# Altium PCB MiniPC.PcbDoc (part 19 of 24)
Units mm, origin at the board's own origin, x right, y up, seen from the top; angles counter-clockwise.
Board outline 175 x 155 mm, 16 copper layers (1_Top, 2_int1_(gnd), 3_int2_(power), 4_int3_(gnd), 5_int4_(sign), 6_int5_(power), 7_int6_(sign), 8_int7_(power), 9_int8_(gnd), 10_int9_(sign), 11_int10_(gnd), 12_int11_(sign), 13_int12_(gnd), 14_int13_(power), 15_int14_(gnd), 16_Bottom), stack 2.008 mm thick; 1046 components, 837 nets, 6010 pads, 4009 vias.
Unrouted connection lines stored in the file: 564.
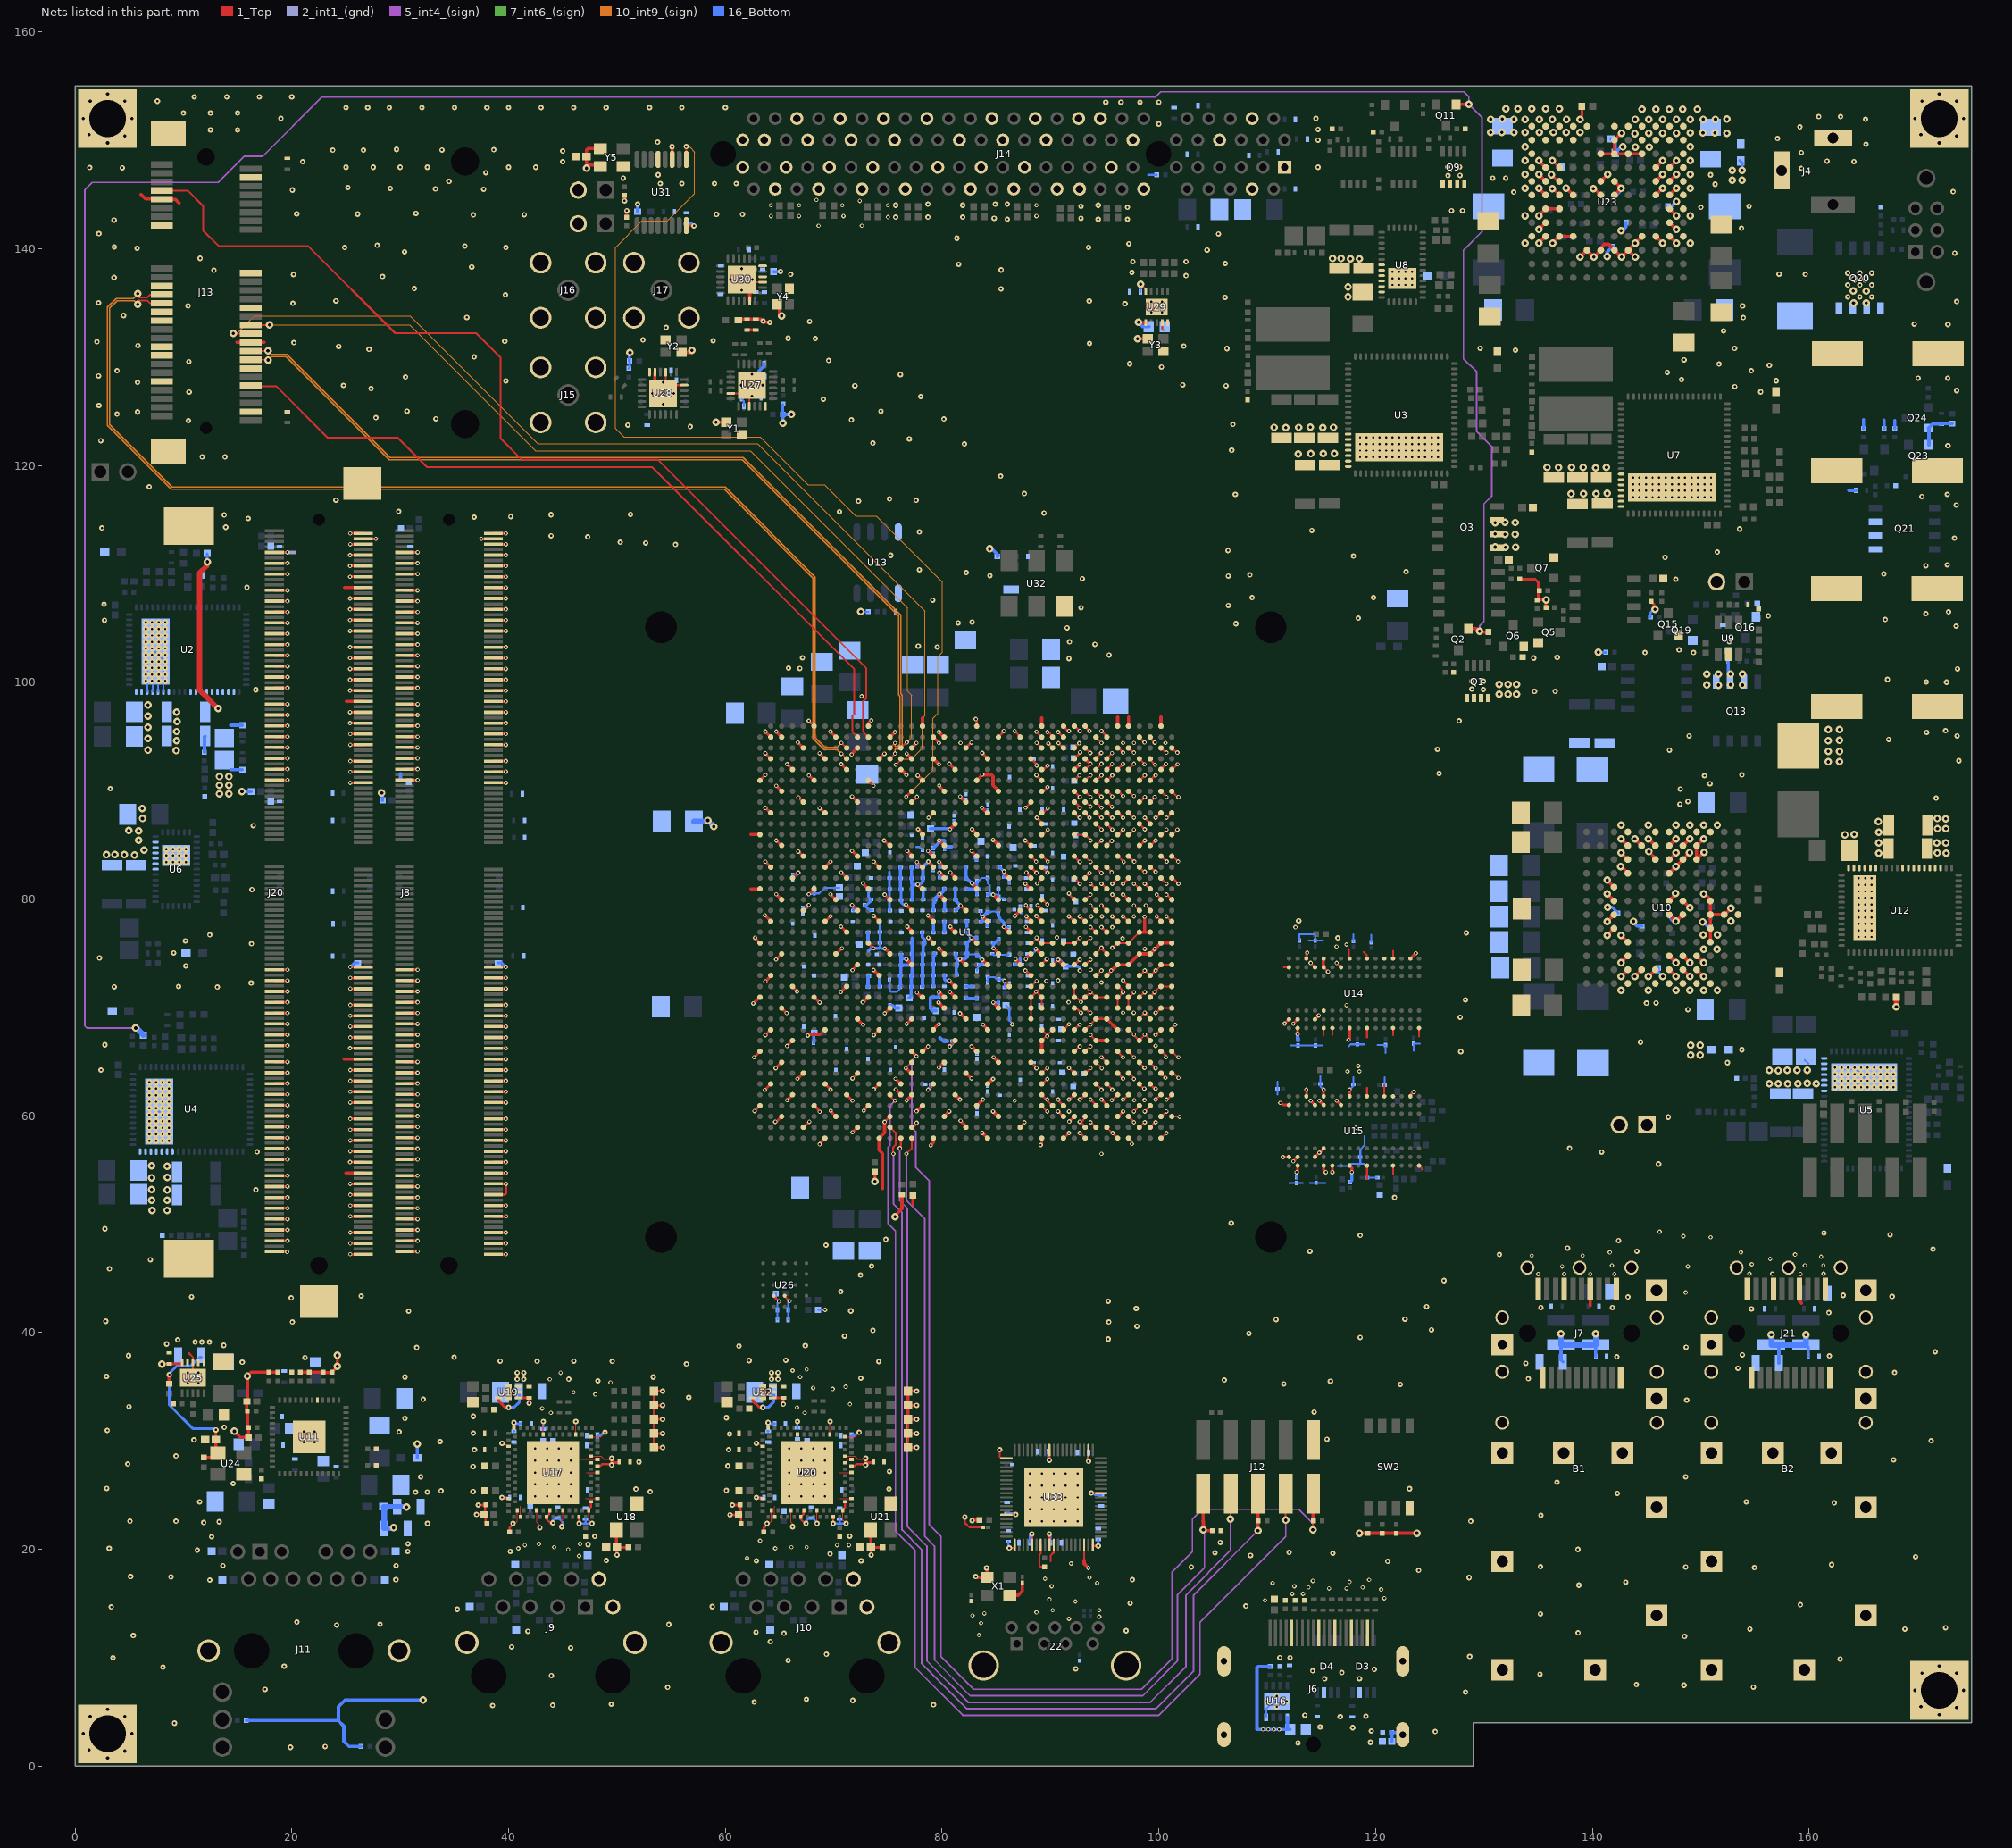
[diagram p31: the nets of this part, all layers, seen from the top]

## Via types
v1: diameter 0.4, hole 0.2, 1_Top to 16_Bottom, tented both sides, 1658 vias
v2: diameter 0.5, hole 0.2, 1_Top to 16_Bottom, tented both sides, 1014 vias
v3: diameter 0.7, hole 0.3, 1_Top to 16_Bottom, tented both sides, 915 vias
v4: diameter 0.6, hole 0.2, 1_Top to 16_Bottom, tented both sides, 278 vias
v5: diameter 0.4, hole 0.2, 1_Top to 16_Bottom, 93 vias
v6: diameter 0.4/0/0/0/0/0/0/0/0/0/0/0/0/0/0/0.4 (per signal layer), hole 0.2, 1_Top to 16_Bottom, tented both sides, 18 vias
v7: diameter 0.4/0/0/0/0/0/0/0/0/0/0/0.4/0.4/0.4/0.4/0.4 (per signal layer), hole 0.2, 1_Top to 16_Bottom, tented both sides, 16 vias
v8: diameter 0.5, hole 0.254, 1_Top to 16_Bottom, tented both sides, 15 vias
v9: diameter 0.5, hole 0.2, 1_Top to 16_Bottom, 2 vias

## Nets (pads, with @x,y where several pads share a name; then routed paths per layer and width w, separated by ;. In a path a pad name is that pad's centre, name@x,y a point inside that pad or via, vN(x,y) a via of type N, cw(c..) or ccw(c..) an arc to the next point about the centre after c; other vN are vias at no path point) (continued)
GND: (continued)
  16_Bottom w0.17: U2.32@6.65,99.11 U2.69@6.65,102.04 ; U2.31@7.15,99.11 7.15,102.54 U2.69@7.42,102.81 8.15,102.08 U2.29@8.15,99.11 ; U4.69@7.5,59.5 7.5,60.13 U4.69@7.77,60.4 8,60.17 U4.69@8,58.3 ; U2.30@7.65,99.11 U2.69@7.65,100.11 ; U6.39@8.875,84.455 U6.39@9.325,84.005 ; C514.2@61.5,126.15 61.7,125.95 C515.2@61.7,125.45 ; C197.1@75.15,72.565 75.16,72.555 75.16,71.54 75.275,71.425 75.825,71.425 76.11,71.71 C199.1@76.11,71.875 ; 77.6,84.8 77.885,84.8 C480.1@78.175,84.51 ; C249.1@82.31,74.975 82.31,74.91 83.055,74.91 C227.1@83.2,74.765 ; C158.1@83.2,73.36 83.2,73.539 83.454,73.793 C424.1@83.454,73.939 ; C184.1@83.2,81.64 83.34,81.64 83.64,81.94 C175.1@84.2,81.94 84.2,81.456 84.4,81.256 84.4,80.61 C436.1@84.2,80.41 ; C179.1@83.535,78.9 83.535,78.59 v1(83.75,78.375) ; 83.7,73.975 v1(83.7,74.4) ; C157.1@84.2,72.285 C260.1@84.2,72.765 84.22,72.785 84.859,72.785 85.054,72.59 C156.1@85.225,72.59 85.61,72.59 v1(85.75,72.45) v1@85.76,72.44 ; C183.1@84.2,78.765 84.471,78.765 84.566,78.86 84.884,78.86 85.079,78.665 C181.1@85.2,78.665 ; C230.1@84.635,74.95 84.771,74.814 85.121,74.814 C262.1@85.2,74.735 ; v1(84.704,80.404) 85.031,80.404 C174.1@85.2,80.235 ; v1@84.71,75.49 v1(84.75,75.45) 85.2,75 C262.1@85.2,74.735 ; C202.1@85.2,80.94 C174.1@85.2,80.235 ; v1(85.7,77.425) 85.735,77.39 C182.1@86.175,77.39 ; C201.1@85.74,79.975 85.74,80.065 85.37,80.065 C174.1@85.225,80.21 C174.1@85.2,80.235 ; C119.1@85.76,71.85 v1@85.76,72.44 ; 86.1,82 86.2,81.9 86.2,81.85 ; C216.1@86.19,74.9 86.025,74.735 85.959,74.735 85.859,74.835 85.3,74.835 C262.1@85.2,74.735 ; C259.1@86.2,72.215 85.985,72.215 v1@85.76,72.44 ; C180.1@87.2,79.315 87.2,78.7 87.4,78.7 ; 88.3,74.9 88.65,75.25 v1(88.65,75.4) ; 99,146.8 R332.2@99.8,146.8 ; U16.8@109.9,4.5 109.9,5.3 110.575,5.975 U16.9@110.875,5.975 ; 110.94,61.94 C269.1@110.94,62.5 110.94,63.16 ; 112.01,53.79 C265.1@112.725,53.79 113.29,53.79 ; 112.2,66.5 112.19,66.49 C264.1@112.85,66.49 C280.1@114.45,66.49 115.09,66.49 ; C270.1@112.95,76.16 112.95,76.75 114.35,76.75 114.425,76.675 C276.1@114.425,76.16 ; 113.84,76.16 C276.1@114.425,76.16 ; 113.9,53.8 115.4,53.8 ; 114.91,63.69 C275.1@114.91,62.95 114.91,62.69 v1(115.2,62.4) ; 115.14,76.16 C276.1@114.425,76.16 ; 116.468,55.368 117.383,55.368 117.59,55.575 118.585,55.575 ; 117.5,66.4 117.69,66.59 C268.1@118.3,66.59 118.99,66.59 ; v1(117.6,62.4) 117.94,62.74 C273.1@117.94,62.9 117.94,63.56 ; C278.1@117.95,76.11 117.95,76.75 ; 118.965,58.11 118.965,57.265 118.585,56.885 C281.1@118.585,56.175 118.585,55.575 ; C272.1@119.6,76.01 119.6,76.7 ; C282.1@120.14,54.3 C279.1@119.235,54.3 119.235,55.24 118.9,55.575 118.585,55.575 ; 120.16,66.54 C266.1@120.9,66.54 120.9,65.8 ; C277.1@120.835,62.825 120.835,63.565 ; 123.5,66 C274.1@123.5,66.665 124.065,66.665 ; C38.1@159.585,65.155 C38.1@159.934,64.806 ; U5.69@162.985,64.306 164.315,64.306 U5.69@165.085,63.536 U5.69@164.355,62.806
  16_Bottom w0.2: C388.1@65.8,41.2 65.8,42.775 v1(65.925,42.9) ; R322.1@68.55,42.1 v1(69.2,42.1)
  16_Bottom w0.25: v1(25.398,73.725) 25.773,74.1 R236.1@26.1,74.1 ; R231.1@39.025,74.1 39.375,74.1 v1(39.75,73.725) ; v1(71.694,79.439) 71.79,79.343 C127.1@71.79,78.925 ; C231.1@73.415,80.95 73.415,80.815 73.2,80.6 73.2,80.215 C244.1@73.465,79.95 73.465,79.865 73.04,79.44 C128.1@72.825,79.44 73.29,78.975 C234.1@73.54,78.975 ; 74.23,77.6 74.265,77.635 C167.1@74.265,76.95 C219.1@74.265,75.95 74.265,75.535 74.371,75.429 v1(74.704,75.429) ; 75.154,82.5 75.154,81.944 C221.1@75.135,81.925 75.135,80.95 C241.1@75.16,80.925 75.16,79.95 C245.1@75.135,79.925 75.135,78.975 C218.1@75.185,78.925 ; 76.21,80.735 C246.1@76.21,79.9 76.21,79.691 76.426,79.475 v1(76.675,79.475) ; C267.1@117.65,53.885 117.8,54.035 v1(117.8,54.8)
  16_Bottom w0.3: C288.1@30.025,90.9 30.025,91.55 ; 63.1,128.7 63.55,129.15 C512.2@63.55,129.4 ; C474.1@68.15,66.735 68.15,67.625 R237.1@68.2,67.675 ; C198.1@73.165,71.875 73.165,72.805 C125.1@73.235,72.875 ; C164.1@73.165,76.925 73.165,75.95 C240.1@73.19,75.925 ; 73.2,75.2 73.45,75.45 v1(73.675,75.45) 74.18,75.45 74.265,75.535 ; 74.229,72.829 74.229,71.961 C238.1@74.265,71.925 ; C124.1@75.175,70.19 75.41,70.19 75.65,69.95 R187.2@76,69.95 ; C199.1@76.11,71.875 76.154,71.919 76.154,72.881 C211.1@76.135,72.9 76.2,72.965 76.2,73.84 C428.1@76.21,73.85 ; C235.1@76.16,82.9 C243.1@76.16,81.9 76.16,80.785 76.21,80.735 ; C426.1@76.21,74.875 76.21,74.5 ; v1(76.7,74.45) 76.65,74.5 76.21,74.5 ; R188.2@76.95,70.875 77.135,71.06 C225.1@77.135,71.9 77.16,71.925 C212.1@77.16,72.925 77.225,72.99 77.225,74.225 ; C256.1@77.185,82.9 C207.1@77.185,81.9 77.185,81.415 77.235,81.365 ; 77.225,76.375 77.225,75.985 C208.1@77.26,75.95 77.235,75.925 C210.1@77.235,74.925 77.225,74.915 77.225,74.225 ; C440.1@77.235,79.95 77.235,81.365 ; C250.1@78.16,71.9 78.185,71.925 C226.1@78.185,72.925 C430.1@78.185,73.95 78.185,74.825 C239.1@78.26,74.9 78.26,75.671 78.36,75.771 C196.1@78.36,75.95 78.36,76.281 78.16,76.481 C236.1@78.16,76.925 ; C427.1@78.26,79.95 78.25,79.96 78.25,80.835 C232.1@78.34,80.925 78.15,80.925 v1(77.75,81.325) ; C459.1@79.175,77.89 79.185,77.88 C209.1@79.185,76.925 ; C204.1@79.175,82.685 79.175,83 v1(78.725,83.45) 78.235,82.96 C144.1@78.235,82.95 C242.1@78.235,81.925 78.235,81.635 77.925,81.325 v1(77.75,81.325) ; C143.1@79.175,84.685 79.725,85.235 v1(79.725,85.4) 80.2,85.4 80.225,85.375 C463.1@80.225,84.61 80.44,84.825 80.9,84.825 ; C251.1@79.185,71.95 79.21,71.975 C213.1@79.21,72.95 C429.1@79.21,73.975 79.21,74.696 79.335,74.821 C222.1@79.335,75 ; C191.1@79.21,78.95 79.21,79.59 79.335,79.715 C438.1@79.335,79.9 79.335,80.035 v1(79.75,80.45) ; 79.8,67.2 80.1,66.9 C451.1@80.44,66.9 ; C233.1@80.185,80.95 80.185,80.771 79.864,80.45 v1(79.75,80.45) ; C163.1@80.21,76.925 C458.1@80.21,77.925 ; C252.1@80.235,72.95 80.235,72.565 80.325,72.475 v1(80.675,72.475) ; C194.1@80.235,78.95 80.235,79.965 v1(79.75,80.45) ; C173.1@81.235,80.925 81.225,80.915 81.225,79.985 C171.1@81.235,79.975 81.235,79.865 v1(81.7,79.4) 81.7,79.39 C176.1@81.285,78.975 ; C214.1@81.285,74.95 81.285,74.515 81.5,74.3 81.385,74.185 C437.1@81.385,73.975 81.385,73.721 81.3,73.636 81.3,73.239 81.385,73.154 C255.1@81.385,72.975 ; v1(81.65,74.45) 82.114,74.45 82.31,74.646 C249.1@82.31,74.91 ; C253.1@82.2,71.915 82.21,71.925 C155.1@82.815,71.925 ; C190.1@82.21,82.9 C188.1@82.21,81.9 82.3,81.9 v1(82.75,81.45) 82.785,81.415 83.2,81.415 83.2,81.115 C187.1@83.39,80.925 83.2,80.735 C435.1@83.2,80.435 ; C200.1@82.225,70.84 82.25,70.815 C195.1@83.225,70.815 ; C249.1@82.31,74.975 82.275,75.01 82.275,75.586 82.31,75.621 82.31,75.9 C160.1@82.285,75.925 82.775,76.415 C166.1@83.175,76.415 83.165,76.425 v1(82.7,76.425) 82.285,76.84 C224.1@82.285,76.975 82.31,77 82.31,77.179 82.275,77.214 82.275,77.94 C203.1@82.31,77.975 ; C439.1@82.31,80.925 C187.1@83.2,80.925 ; 82.9,84.2 83.035,84.065 83.035,83.75 C193.1@83.175,83.61 ; C227.1@83.2,74.765 83.335,74.765 v1(83.7,74.4) ; C424.1@83.454,73.939 83.49,73.975 83.7,73.975 ; C177.1@83.585,77.925 C177.1@83.635,77.975 ; C162.1@84.175,77.51 84.175,77.81 C185.1@84.34,77.975 C177.1@83.635,77.975 ; C183.1@84.2,78.765 84.14,78.765 v1(83.75,78.375) 83.75,78.09 C177.1@83.635,77.975 ; C436.1@84.2,80.41 84.698,80.41 v1(84.704,80.404) ; v1@84.71,75.49 C254.1@84.71,75.95 84.86,75.95 C165.1@85.225,76.315 ; v1(84.725,70.45) 84.76,70.415 C120.1@85.2,70.415 ; C181.1@85.2,78.665 85.2,78.4 85.304,78.296 85.304,78.217 85.7,77.822 v1(85.7,77.425) ; C170.1@85.335,82.925 85.335,82.91 85.71,82.535 C172.1@85.71,82 86.1,82 ; C192.1@86.2,81.51 86.2,81.85 ; C263.1@86.71,73.975 C229.1@87.365,73.975 ; 87.2,74.5 87.2,74.14 C229.1@87.365,73.975 ; C229.1@87.39,73.95 C229.1@87.365,73.975 ; v1(90.7,74.4) 90.79,74.4 C417.1@91.4,73.79 92.51,73.79 92.7,73.6 v5(92.7,73.4) ; Q23.2@171.05,121.9 171.05,123.4 Q24.2@171,123.45 171.35,123.8 C79.1@172.2,123.8 172.25,123.85 R140.1@173.2,123.85 ; C428.1@76.21,73.85 76.21,74.5 ; C428.1@76.21,73.85 76.26,73.9 76.886,73.9 76.893,73.893 77.225,74.225 ; 77.235,81.365 77.275,81.325 v1(77.75,81.325)
  other v1: 91.7,13.6 94.5,13.8 94.5,14.4 92.3,15.2 148.6,43.7 135,45.4 137.4,45.4 139.8,45.4 142.025,45.4 159.2,45.4 154.475,45.425 156.6,45.425 161.325,45.425 137.2,46.1 148.8,46.1 141.8,46.2 159.6,46.2 161.3,46.2 154.7,46.3 156.4,46.8 161.1,47 134.4,47.1 139.1,47.1 158.7,47.2 141.6,47.4 153.7,47.4 150.9,48.8 148.4,48.9 146.2,49.3 114.8,56.6 97.72,61.44 98.67,61.45 99.7,66.46 93.7,68.4 97.68,69.5 96.7,69.52 89.61,72.44 95.6,73.4 73.679,73.454 94.7,75.5 96.65,76.37 88.725,76.425 90.6,76.45 83.7,91.475 93.7,92.475 90.7,95.4 72.579,98.705 68.6,142.1 72.6,142.1 75,142.9 64.2,143 66.8,143 70.9,143 88.7,143 64.2,144 66.8,144 70.8,144 75,144 88.7,144 72.4,144.4 68.4,144.5
  other v2: 19.875,1.75 23.075,1.825 112.825,2.15 119.525,2.2 125.5,3.2 119.6,3.25 117.88,3.56 114.875,3.625 9.175,3.975 116.73,4.56 119.11,4.61 113.46,4.7 110.875,5.475 38.525,5.6 44.075,5.625 79.2,5.675 49.475,5.725 62.675,5.925 109.975,5.975 111.775,5.975 71.75,6.075 67.475,6.175 110.875,6.475 128.3,6.825 17.525,7.1 54.675,7.275 154.85,7.3 148.45,7.475 144.05,7.525 115.3,8.06 118.5,8.08 43.95,8.375 135.15,8.5 116.88,8.64 114.18,8.81 119.87,8.92 92.325,8.975 8.1,9.125 19.3,9.225 65.8,9.775 162.85,9.9 3.5,10 111.15,10.025 112.1,10.025 128.675,10.125 69.325,10.325 45.725,10.925 40.275,11 64.15,11.5 148.5,11.975 5.375,12.05 65.41,12.27 138.675,12.3 62.84,12.36 41.775,12.45 96.975,12.5 154.525,12.65 168.825,12.65 172.575,12.775 24.125,13.025 54.775,13.075 28.15,13.1 20.475,13.3 135.2,14.05 35.275,14.475 3.35,14.7 58.8,14.725 108.025,14.775 159.2,14.9 97.35,15.05 138.75,16.7 143.075,16.975 12.425,17.175 29.6,17.2 97.55,17.2 128.625,17.4 8.85,17.45 5.125,17.5 123.975,18.075 154.95,18.325 103,18.375 148.6,18.375 135.2,18.4 13.64,18.5 29.625,18.5 162.05,18.6 121.1,18.9 62.85,18.95 72.525,18.95 49.025,18.975 169.825,19.325 108.45,19.45 69.65,19.6 116.05,19.65 105.17,19.69 112.025,19.725 30.7,19.825 40.15,19.825 11.275,19.925 138.65,20 3.15,20.1 47.325,20.45 30.725,20.525 105.66,20.64 12.59,21.17 47.95,21.2 71.475,21.225 32.525,22.4 11.88,22.48 13.3,22.55 5.075,22.6 9.325,22.6 88.1,22.6 89.2,22.6 90.3,22.6 91.4,22.6 92.5,22.6 128.775,22.6 135.25,23.15 88.1,23.7 89.2,23.7 90.3,23.7 91.4,23.7 92.5,23.7 162.3,24.3 11.5,24.4 154.2,24.4 88.1,24.8 89.2,24.8 90.3,24.8 91.4,24.8 92.5,24.8 42.45,24.9 43.55,24.9 44.65,24.9 45.75,24.9 65.9,24.9 67,24.9 68.1,24.9 69.2,24.9 142.3,25.175 31.425,25.275 32.5,25.3 53.075,25.325 36.725,25.35 33.775,25.4 60.1,25.45 51.75,25.575 75.1,25.575 123.125,25.6 2.925,25.625 88.1,25.9 89.2,25.9 90.3,25.9 91.4,25.9 92.5,25.9 42.45,26 43.55,26 44.65,26 45.75,26 65.9,26 67,26 68.1,26 69.2,26 14.587,26.075 136.725,26.2 31.9,26.7 148.6,26.7 88.1,27 89.2,27 90.3,27 91.4,27 92.5,27 42.45,27.1 43.55,27.1 44.65,27.1 45.75,27.1 65.9,27.1 67,27.1 68.1,27.1 69.2,27.1 75.125,27.2 36.725,27.65 60.225,27.7 4.875,27.875 52.025,28.075 42.45,28.2 43.55,28.2 44.65,28.2 45.75,28.2 65.9,28.2 67,28.2 68.1,28.2 69.2,28.2 167.775,28.275 9.325,28.625 36.85,29.2 60.3,29.2 42.45,29.3 43.55,29.3 44.65,29.3 45.75,29.3 65.9,29.3 67,29.3 68.1,29.3 69.2,29.3 21.112,29.875 22.112,29.875 33.675,29.95 171.25,30.025 10.975,30.1 115.51,30.165 60.375,30.65 36.75,30.725 29.9,30.85 21.112,30.875 22.112,30.875 2.975,30.975 13.775,31.25 30.425,32.075 60.1,32.15 36.75,32.275 114.325,32.675 4.975,33.175 148.7,33.775 32.125,33.85 56.625,34.025 122.275,35.225 111.525,35.275 10.387,35.325 11.387,35.325 115.825,35.525 48.225,35.55 106.025,35.625 45.55,35.7 134.08,35.75 72.5,35.8 30.425,35.9 53.35,35.9 2.9,35.975 10.387,36.325 11.387,36.325 167.875,36.325 153.43,36.71 56.4,37.1 133.85,37.17 15.425,37.275 74.15,37.325 42.625,37.35 49.575,37.35 39.225,37.375 46.025,37.375 62.2,37.425 65.575,37.45 21.225,37.7 34.975,37.725 142.25,37.77 161.86,37.84 4.925,37.875 153.83,37.95 171.625,38.225 31.525,38.625 148.65,38.65 61.25,38.75 67.375,38.8 13.725,38.825 8.45,38.95 9.475,39.325 95.325,39.4 118.575,39.55 71,39.675 108.3,39.925 73.625,40.2 125.15,40.25 97.975,40.575 20.05,40.975 95.375,40.975 2.825,41.05 110.8,41.2 122.7,41.25 161.81,41.84 30.775,41.975 71.575,42 154.67,42.19 97.9,42.225 135.25,42.31 141.84,42.31 124.7,42.4 95.325,42.9 19.95,43.2 10.75,43.3 143.27,43.29 167.65,43.325 26.4,43.375 163.14,43.44 70.65,43.775 126.3,44.8 72.475,45.3 3.175,45.875 73.5,46.125 6.95,46.725 131.4,47.2 113.925,47.5 144.1,47.5 171.425,47.7 137.7,47.8 69.275,48.075 142.4,48.5 74.8,48.6 118.575,48.975 167.45,49.025 161.35,49.2 2.775,49.575 106.675,50.1 121.75,52.475 16.7,53.175 146.1,55.55 140.85,56.65 16.8,56.675 137.9,57 147,59.875 2.4,64.225 152.45,64.9 127.85,65.925 153.775,66.1 2.75,66.55 144.44,66.795 127.8,69.1 148.815,69.795 144.99,70.395 145.865,70.42 128.275,70.7 13.125,71.875 3.625,71.9 9.55,71.925 16.25,72.25 10.225,73.825 2.25,74.55 9.1,75.025 16.275,75.875 10.19,76.14 116.5,76.4 12.425,76.7 128.35,76.875 112.9,78 16.325,80.875 16.45,86.775 148.065,88.745 148.815,88.995 171.705,89.31 148.115,90.145 3.25,90.175 150.84,90.645 150.34,91.37 153.79,91.445 125.85,91.575 173.8,92.75 147.095,93.725 125.7,93.8 167.325,94.725 148.92,95.05 173.65,95.05 170.825,95.375 172.575,95.525 127.7,96.425 134.65,99.15 136.55,99.15 16.675,99.3 172.675,100 170.8,100.025 167.225,100.25 173.675,101.225 66.875,101.275 65.825,101.3 91.7,102.175 134.575,102.225 67.125,102.25 136.75,102.275 95.4,102.5 144.845,102.725 149.32,102.725 147.995,102.975 79.55,103.25 77.8,103.325 94.1,103.5 91.75,103.725 152.62,103.75 91.525,105.025 173.55,105.175 107.1,105.4 81.475,105.475 82.775,105.55 2.725,105.725 167.025,105.775 118.4,105.9 156.22,106.107 170.775,106.325 172.85,106.475 92.825,106.875 106.4,107.075 2.675,107.175 79.125,107.575 108.6,107.8 119.8,107.8 15.875,108.75 147.695,109.5 92.925,109.55 84.4,109.825 106.4,109.8 108.4,109.9 166.875,109.975 82.225,110.1 122.8,110.2 77.9,110.375 170.775,110.75 172.75,110.825 146.69,111.5 117.95,111.625 75.25,111.7 151.51,112 106.375,112.15 55.4,112.7 52.65,112.85 50.3,112.9 173.4,113.275 47.3,113.4 43.925,113.5 77.9,113.85 114.1,114 153.57,114.135 2.475,114.225 13.9,114.3 15.975,115.1 36.825,115.225 40.2,115.275 13.775,115.425 43.925,115.45 51.25,115.475 89.4,115.6 70.525,115.725 29.85,115.75 173.575,116.35 72.275,116.7 77.6,116.775 24.075,116.8 75.15,116.9 170.4,117.125 107.05,117.325 172.75,117.325 87.6,117.4 6.85,118.025 85.4,119 11.725,120.775 13.825,120.775 106.72,121.39 172.8,121.8 82.05,121.975 73.6,122.05 2.375,122.275 76.975,122.45 56.75,123.575 51,123.725 106.83,123.78 10.45,124.125 71.625,124.2 80.15,124.275 33.3,124.3 27.75,124.4 3.875,124.725 5.775,124.925 30.625,125 74.35,125 2.2,125.525 69.05,126.1 78.025,126.35 10.525,126.775 155.53,126.78 173.6,126.905 27.3,127.075 153.14,127.26 71.95,127.35 106.2,127.35 24.775,127.375 102.2,127.425 5.775,127.65 39.75,127.8 156.96,127.81 148.22,127.91 170.05,128.05 172.775,128.05 30.5,128.15 2.175,128.25 76.15,128.375 146.89,128.59 154.66,128.72 3.875,128.725 100.24,129.07 156.32,129.22 151.68,129.35 97.3,129.375 10.5,129.575 69.525,129.675 148.45,129.74 36.825,130 132.89,130.635 27.125,130.7 106.275,130.775 153.12,130.78 129.64,130.81 24.325,130.975 102.3,131 5.8,131.05 93.6,131.25 20.2,131.325 2.025,131.4 39.65,131.45 58.875,131.5 52.4,131.575 68.3,131.7 65.8,131.725 152.11,132.41 54.525,132.725 172.8,133 169.7,133.025 67.775,133.275 36.15,133.65 153.925,133.625 4.475,133.825 99.3,134.115 100.3,134.115 10.425,134.7 153.85,134.7 96.875,134.9 20.1,134.95 2.175,135 99.3,135.115 100.3,135.115 173.6,135.115 93.575,135.15 24.075,135.175 106.1,135.5 39.7,135.725 85.425,136.275 31.3,136.3 3.6,137.325 28.375,137.425 102.5,137.5 20.15,137.6 66.025,137.625 159.65,137.625 157.225,137.65 97.5,137.8 12.825,138 85.45,138.025 36.6,138.3 81.525,138.55 106.125,138.625 97.6,138.8 102.5,138.8 11.55,139.1 173.425,139.575 30.4,139.7 104.45,139.875 5.725,140.025 24.875,140.1 39.75,140.1 93.5,140.125 3.625,140.15 35.975,140.225 27.875,140.3 97.225,140.45 81.35,140.95 105.5,141.35 2.2,141.375 153.75,141.875 3.6,142.625 86,142.7 94.4,142.7 97.1,142.7 84.8,142.8 92.8,142.8 75.7,142.9 78.7,142.9 81.9,142.9 36.75,143.1 41.45,143.125 26.075,143.175 59.175,143.15 61.575,143.15 20.45,143.2 31.45,143.25 127,143.5 128,143.5 97.1,143.8 150,143.8 92.8,143.9 154.45,143.9 75.7,144 81.9,144 94.4,144 78.7,144.1 84.9,144.1 86,144.1 132.75,145.2 173.275,145.25 20.05,145.4 37.7,145.475 33.25,145.5 29.1,145.55 25.175,145.625 151.325,145.94 54,146 56,146 59,146 61,146 34.5,146.2 50.575,146.5 130.8,146.5 132,146.5 53.8,146.8 150.9,146.8 37.9,147 159.275,147.4 4.35,147.45 1.35,147.475 25,147.5 27.5,147.5 30,147.5 32.5,147.5 40,147.5 42.5,147.5 114.683,147.5 21,148 45,148 164.125,148.025 161.65,148.075 159.275,148.85 45,149 23.775,149.075 26.6,149.075 33.85,149.1 38.625,149.125 29.675,149.15 165.225,149.625 53.75,149.825 114.683,150 157.075,150.15 12.5,150.95 15,150.95 114.683,151 159.125,151.225 100,151.5 165.2,151.925 19,152 114.5,152 160.875,152.175 162.9,152.175 10,152.5 12.5,152.5 15,152.5 25,153 27,153 29,153 32,153 35,153 38,153 40,153 43,153 46,153 49,153 53,153 56,153 60,153 95.1,153.5 96.5,153.5 98.25,153.5 100,153.5 7.6,153.6 11,154 14,154 17,154 20,154
  other v3: 3,0.75 4.6,1.4 1.3,1.5 0.75,3 5.25,3 1.4,4.6 4.6,4.6 172,4.75 3,5.25 173.6,5.4 170.3,5.5 169.75,7 174.25,7 170.4,8.6 173.6,8.6 172,9.25 7.09,51.27 8.49,51.26 7.08,52.2 8.49,52.21 8.51,53.18 7.07,53.19 7.07,54.29 8.52,54.32 8.49,55.35 7.07,55.39 156.31,62.96 157.15,62.96 158,62.95 158.95,62.98 160.65,62.97 159.83,62.99 157.13,64.18 156.31,64.19 157.98,64.19 158.87,64.19 159.82,64.22 142.63,71.575 145.17,71.575 147.71,71.575 148.98,71.575 150.25,71.575 151.52,71.575 150.265,75.37 151.49,75.37 150.215,76.695 151.54,76.695 152.79,77.95 5.48,84.06 2.9,84.08 3.67,84.09 4.55,84.08 166.42,84.23 6.36,84.51 166.4,85.18 5.88,85.41 163.3,85.93 164.14,85.94 166.4,86.17 5.88,86.28 4.96,86.31 142.63,86.815 145.17,86.815 147.71,86.815 148.98,86.815 150.25,86.815 151.52,86.815 166.39,87.15 6.22,87.42 6.2,88.34 9.33,93.68 6.72,93.72 9.36,94.6 6.73,94.81 9.38,95.45 6.73,95.84 9.42,96.38 6.73,96.86 9.38,97.25 6.73,97.91 138.04,117.37 139.19,117.38 140.33,117.4 141.37,117.41 136.88,119.8 140.29,119.79 135.82,119.81 138.08,119.81 139.16,119.83 141.3,119.81 112.86,121.065 114.01,121.075 115.15,121.095 116.19,121.105 115.11,123.485 110.64,123.505 111.7,123.495 112.9,123.505 116.12,123.505 113.98,123.525 117.45,135.54 117.45,136.45 118.51,139.05 116.01,139.08 116.82,139.08 117.67,139.07 133.78,140.49 149.02,140.49 133.78,143.03 149.02,143.03 133.78,145.57 149.02,145.57 133.78,146.84 149.02,146.84 133.78,148.11 149.02,148.11 145.25,149.35 133.78,149.38 143.95,149.375 149.02,149.38 3,149.75 172,149.75 4.6,150.4 173.6,150.4 1.3,150.5 170.3,150.5 0.75,152 5.25,152 169.75,152 174.25,152 1.4,153.6 4.6,153.6 170.4,153.6 173.6,153.6 3,154.25 172,154.25
  other v4: 6.87,57.7 7.47,57.7 8.07,57.7 8.67,57.7 6.87,58.3 7.47,58.3 8.07,58.3 8.67,58.3 6.87,58.9 7.47,58.9 8.07,58.9 8.67,58.9 6.87,59.5 7.47,59.5 8.07,59.5 8.67,59.5 6.87,60.1 7.47,60.1 8.07,60.1 8.67,60.1 6.87,60.7 7.47,60.7 8.07,60.7 8.67,60.7 6.87,61.3 7.47,61.3 8.07,61.3 8.67,61.3 6.87,61.9 7.47,61.9 8.07,61.9 8.67,61.9 6.87,62.5 7.47,62.5 8.07,62.5 8.67,62.5 162.385,62.636 162.985,62.636 163.585,62.636 164.185,62.636 164.785,62.636 165.385,62.636 165.985,62.636 166.585,62.636 167.185,62.636 167.785,62.636 6.87,63.1 7.47,63.1 8.07,63.1 8.67,63.1 162.385,63.236 162.985,63.236 163.585,63.236 164.185,63.236 164.785,63.236 165.385,63.236 165.985,63.236 166.585,63.236 167.185,63.236 167.785,63.236 162.385,63.836 162.985,63.836 163.585,63.836 164.185,63.836 164.785,63.836 165.385,63.836 165.985,63.836 166.585,63.836 167.185,63.836 167.785,63.836 162.385,64.436 162.985,64.436 163.585,64.436 164.185,64.436 164.785,64.436 165.385,64.436 165.985,64.436 166.585,64.436 167.185,64.436 167.785,64.436 164.554,76.5 165.154,76.5 165.754,76.5 164.554,77.1 165.154,77.1 165.754,77.1 164.554,77.7 165.154,77.7 165.754,77.7 164.554,78.3 165.154,78.3 165.754,78.3 164.554,78.9 165.154,78.9 165.754,78.9 164.554,79.5 165.154,79.5 165.754,79.5 164.554,80.1 165.154,80.1 165.754,80.1 164.554,80.7 165.154,80.7 165.754,80.7 164.554,81.3 165.154,81.3 165.754,81.3 164.554,81.9 165.154,81.9 165.754,81.9 8.425,83.405 9.025,83.405 9.625,83.405 10.225,83.405 8.425,84.005 9.025,84.005 9.625,84.005 10.225,84.005 8.425,84.605 9.025,84.605 9.625,84.605 10.225,84.605 6.52,100.11 7.12,100.11 7.72,100.11 8.32,100.11 6.52,100.71 7.12,100.71 7.72,100.71 8.32,100.71 6.52,101.31 7.12,101.31 7.72,101.31 8.32,101.31 6.52,101.91 7.12,101.91 7.72,101.91 8.32,101.91 6.52,102.51 7.12,102.51 7.72,102.51 8.32,102.51 6.52,103.11 7.12,103.11 7.72,103.11 8.32,103.11 6.52,103.71 7.12,103.71 7.72,103.71 8.32,103.71 6.52,104.31 7.12,104.31 7.72,104.31 8.32,104.31 6.52,104.91 7.12,104.91 7.72,104.91 8.32,104.91 6.52,105.51 7.12,105.51 7.72,105.51 8.32,105.51 143.745,117.07 144.345,117.07 144.945,117.07 145.545,117.07 146.145,117.07 146.745,117.07 147.345,117.07 147.945,117.07 148.545,117.07 149.145,117.07 149.745,117.07 150.345,117.07 150.945,117.07 143.745,117.67 144.345,117.67 144.945,117.67 145.545,117.67 146.145,117.67 146.745,117.67 147.345,117.67 147.945,117.67 148.545,117.67 149.145,117.67 149.745,117.67 150.345,117.67 150.945,117.67 143.745,118.27 144.345,118.27 144.945,118.27 145.545,118.27 146.145,118.27 146.745,118.27 147.345,118.27 147.945,118.27 148.545,118.27 149.145,118.27 149.745,118.27 150.345,118.27 150.945,118.27 143.745,118.87 144.345,118.87 144.945,118.87 145.545,118.87 146.145,118.87 146.745,118.87 147.345,118.87 147.945,118.87 148.545,118.87 149.145,118.87 149.745,118.87 150.345,118.87 150.945,118.87 118.565,120.765 119.165,120.765 119.765,120.765 120.365,120.765 120.965,120.765 121.565,120.765 122.165,120.765 122.765,120.765 123.365,120.765 123.965,120.765 124.565,120.765 125.165,120.765 125.765,120.765 118.565,121.365 119.165,121.365 119.765,121.365 120.365,121.365 120.965,121.365 121.565,121.365 122.165,121.365 122.765,121.365 123.365,121.365 123.965,121.365 124.565,121.365 125.165,121.365 125.765,121.365 118.565,121.965 119.165,121.965 119.765,121.965 120.365,121.965 120.965,121.965 121.565,121.965 122.165,121.965 122.765,121.965 123.365,121.965 123.965,121.965 124.565,121.965 125.165,121.965 125.765,121.965 118.565,122.565 119.165,122.565 119.765,122.565 120.365,122.565 120.965,122.565 121.565,122.565 122.165,122.565 122.765,122.565 123.365,122.565 123.965,122.565 124.565,122.565 125.165,122.565 125.765,122.565 121.55,136.645 122.15,136.645 122.75,136.645 123.35,136.645 121.55,137.245 122.15,137.245 122.75,137.245 123.35,137.245 121.55,137.845 122.15,137.845 122.75,137.845 123.35,137.845
  other v5: 83.4,12.1 83.6,13.2 82.8,13.9 83.9,14.1 88.7,14.2 90.2,14.4 109.8,15.3 89.9,15.4 120.8,15.5 112.3,15.9 113.3,15.9 120.5,16.3 115.7,16.4 117.3,16.4 113.8,16.5 118.8,16.5 90.1,16.6 112.5,16.6 94.3,16.9 110.5,16.9 117.6,17 114.2,17.1 119.4,17.2 89.5,17.3 93.6,17.4 91.9,18.7 62,19.2 46.5,19.4 45.5,20 40.9,20.1 64.6,20.1 44.2,20.2 66.1,20.2 67.5,20.2 41.5,20.4 70.3,20.4 71.4,20.4 42.8,20.5 46.6,20.5 63.2,20.8 43.9,32.6 67.3,32.6 43.1,33 66.6,33.1 71.5,33.4 48,34.3 46,34.5 69.9,34.8 68.1,34.9 71.1,35 49.4,35.4 43.8,35.7 66.9,35.9 44.8,36.3 66.2,36.5 67.5,36.6 94.7,56.5 118.2,58.9 91.7,60.4 86.7,61.4 117.4,64.1 118.5,64.1 118.4,64.6 117.3,70.2 91.675,70.475 94.7,72.3 90.7,72.5 93.71,73.47 98.7,75.4 99.6,75.4 116.383,75.616 117.3,75.8 95.7,77.4 112.6,77.4 93.75,78.4 94.75,78.4 97.7,78.4 81.7,94.4 96.7,94.4 97.7,94.4 100.6,94.4
  other v8: 54.25,125.65 62.45,126.4 53.25,126.65 55.25,126.65 61.45,127.4 63.45,127.4 54.25,127.65 62.45,128.4 61.495,136.15 60.495,137.15 62.495,137.15 61.495,138.15
GND_DP: C308.2 J6.21 J6.22 J6.23 J6.24 R248.2 | length 1.8
  16_Bottom w0.3: R248.2@121.45,3.1 R248.2@121.49,3.1 ; R248.2@121.45,3.2 121.49,3.16 R248.2@121.49,3.1 ; C308.2@121.49,2.3 R248.2@121.49,3.1 ; J6.23@122.25,3 122.15,3.1 R248.2@121.49,3.1
GND_SIGNAL1: L8.2 R150.1 R151.2 R152.1 R153.2 R154.2 U10.F7 U10.F8 U10.G7 U10.G8 | length 8.7
  1_Top w0.3: U10.G7@147.075,78.56 v3(147.69,77.945) 147.73,77.945 U10.G8@148.345,78.56 ; U10.F7@147.075,79.83 147.66,80.415 v3(147.66,80.507) ; U10.F8@148.345,79.83 v3(148.98,79.195)
  16_Bottom w0.25: v3(150.165,77.895) 150.19,77.895 150.59,77.495 R152.1@150.89,77.495
  16_Bottom w0.3: v3(141.39,79.245) 141.815,79.245 R150.1@142.365,78.695 ; v3(143.796,77.939) 143.796,77.851 143.79,77.845 144.14,77.495 R153.2@144.565,77.495 ; R151.2@146.06,73.635 146.06,73.275 v3(146.49,72.845) ; R154.2@147.04,78.595 147.04,78.395 147.49,77.945 v3(147.69,77.945)
  other v3: 149.05,65.6 149.95,65.6 149.05,66.5 149.95,66.5
GND_SIGNAL2: C106.1 L9.2 R167.1 R168.2 R169.1 R170.2 R171.2 U23.F7 U23.F8 U23.G7 U23.G8 | length 11
  1_Top w0.3: v3(140.088,145.52) 140.18,145.52 U23.F7@140.765,144.935 ; U23.F8@140.765,146.205 v3(141.4,146.84) ; U23.G7@142.035,144.935 v3(142.65,145.55) 142.65,145.59 U23.G8@142.035,146.205
  16_Bottom w0.3: v3@141.35,139.25 141.35,139.675 R167.1@141.9,140.225 ; R169.1@141.7,150.125 142.1,149.725 C106.1@142.1,148.825 v3@142.625,149.35 ; R171.2@142,144.9 142.2,144.9 142.65,145.35 v3(142.65,145.55) ; v3(142.656,141.656) 142.744,141.656 142.75,141.65 143.1,142 R170.2@143.1,142.425 ; R168.2@146.96,143.92 147.32,143.92 v3(147.75,144.35) ; L9.2@153.6,148.125 153.8,147.925 v3(153.8,147.2)
  other v3: 141.35,139.25 152.9,146.3 153.8,146.3 152.9,147.2 142.787,149.38
HPS_0V95: C142.2 C143.2 C144.2 C145.2 C146.2 R25.2 R27.1 U1.N17 U1.P16 U1.P18 U1.R18 | length 8
  1_Top w0.3: v1(77.675,83.4) 78.136,82.939 U1.P16@78.194,82.939 ; v1(78.704,84.429) 78.721,84.429 79.194,83.956 U1.N17@79.194,83.939 ; v1(79.725,83.4) 79.733,83.4 U1.P18@80.194,82.939 ; v1(79.75,82.425) 79.825,82.425 80.194,82.056 U1.R18@80.194,81.939
  16_Bottom w0.3: 14.36,91.92 R25.2@15.44,91.92 ; v1(77.675,83.4) 77.675,82.99 C144.2@77.715,82.95 ; v1(78.704,84.429) 78.968,84.165 C143.2@79.175,84.165 ; v1(79.725,83.4) 79.84,83.285 C145.2@79.84,82.95 ; v1(79.75,82.425) 79.79,82.385 C146.2@79.79,81.975
  16_Bottom w0.5: C142.2@57.1,87.15 58.275,87.15 v3(58.375,87.25) 58.925,86.7 v3(58.925,86.675)
  other v3: 13.31,89.69 14.21,89.69 13.31,90.49 14.21,90.49 13.31,91.29 14.21,91.29
HPS_0V95OUT: C11.2 C12.2 R23.2 R26.1 R27.2 R28.1 R29.2 U2.16 U2.17 U2.18 U2.19 U2.20 U2.21 U2.22 U2.23 U2.24 | length 19.3
  1_Top w0.5: v3@12.15,111.05 12.15,110.736 11.5,110.086 11.5,99.26 13.18,97.58 v3(13.19,97.58)
  16_Bottom w0.25: R29.2@11.6,109.86 11.6,110.26 12.2,110.86 v3(12.2,111.1) R26.1@12.2,111.86
  16_Bottom w0.3: R28.1@11.94,93.54 11.94,94.975 C11.2@11.995,95.03 ; 14.36,96.03 R23.2@15.44,96.03
HPS_CLK1: U1.G15 U31.1 | length 90.1
  1_Top w0.17: v2(56.388,149.403) 56.395,149.395 U31.1@56.395,148.226
  1_Top w0.25: v5(76.683,89.428) U1.G15@77.194,89.939
  10_int9_(sign) w0.1: v2(56.388,149.403) 56.693,149.403 57.175,148.92 57.175,145.085 54.635,142.545 52.299,142.545 49.86,140.106 49.86,123.393 50.643,122.61 63.228,122.61 67.626,118.212 69.164,118.212 72.034,115.341 73.939,115.341 80.035,109.245 80.035,102.768 79.604,102.337 79.604,97.13 79.146,96.672 79.146,91.892 v5(76.683,89.428)
IO_1V8: C388.2 C389.2 C445.2 C446.2 C447.2 C448.2 C449.2 C450.2 C451.2 C452.2 C453.2 C454.2 C455.2 C456.2 C457.2 C539.2 C540.2 C546.2 C570.2 C571.2 C572.2 C573.2 C574.2 L14.1 L17.2 L18.2 L20.2 Q3.1 Q3.2 Q3.3 R195.1 R196.1 R203.1 R207.1 R300.2 R301.2 R302.2 R303.1 R305.2 R306.1 R308.1 R310.1 R312.1 R313.1 R317.1 R318.1 R319.1 R321.1 R324.1 R325.1 R326.1 R333.1 R334.1 R343.1 U1.AF18 U1.AF19 U1.AK19 U1.AL21 U1.AM18 U1.AP17 U1.AP22 U1.AT21 U1.H20 U1.J22 U1.K19 U1.R4 U1.T6 U1.V5 U26.B4 U31.16 U33.14 U33.38 U33.49 U33.59 U33.68 | length 74.7
  1_Top w0.2: U31.16@56.395,142.126 57.174,142.126 57.2,142.1 v2(57.1,142.1) ; U26.B4@64.475,43.4 64.475,43.35 v1(64.95,42.875) ; v1(78.7,62.4) 78.7,62.445 U1.AP17@79.194,62.939 ; v1(80.7,66.4) 80.7,66.445 U1.AK19@81.194,66.939 ; v1@83.68,61.425 v1(83.755,61.5) ; v1@84.655,63.4 v1(84.7,63.4) ; U33.14@85.925,23.2 86.875,23.2 86.85,23.225 v2(86.8,23.225) ; v2(89.9,28.225) U33.68@89.9,29.175 ; v2(93.5,28.125) U33.59@93.5,29.175 ; v2(93.775,25.2) U33.49@94.675,25.2 ; U33.38@93.9,20.425 94,20.325 v2(94.4,20.325)
  1_Top w0.25: U1.R4@66.194,81.939 66.68,82.425 v1(66.725,82.425) ; U1.V5@67.194,78.939 v1(67.694,79.439) ; v1(67.694,80.439) U1.T6@68.194,80.939
  1_Top w0.3: v3(14.7,30.9) 15.25,30.35 R301.2@16,30.35 ; R300.2@15.85,33.65 15.85,32.872 R305.2@15.897,32.825 ; R301.2@15.897,30.425 16,30.529 R313.1@16,31.25 ; R300.2@15.897,33.625 15.897,35.997 v3(15.9,36) 16.25,36.35 R302.2@17.9,36.35 ; R305.2@15.9,32.75 15.9,31.222 R313.1@15.997,31.125 ; R302.2@17.797,36.325 17.821,36.35 R312.1@18.7,36.35 ; R310.1@20.797,36.325 20.821,36.35 R308.1@21.6,36.35 ; R308.1@21.697,36.325 21.721,36.35 R306.1@22.9,36.35 ; R306.1@22.897,36.325 23.676,36.325 R303.1@23.7,36.35 24.2,36.85 v3(24.2,36.9) v3(24.2,37.9) ; L20.2@61.2,133.4 61.3,133.5 C539.2@62,133.5 C540.2@62.8,133.5 63.3,133.5 v2(63.5,133.3) 63.6,133.2 v2(64.1,133.2) ; v3(73.8,53.95) R324.1@73.8,54.825 ; v3(75.65,50.7) 75.65,50.775 76.3,51.425 R325.1@76.3,52.75 ; v1(79.7,64.45) 79.705,64.45 U1.AM18@80.194,64.939 ; v1(79.7,71.425) 79.708,71.425 U1.AF18@80.194,70.939 ; v1(80.725,71.425) 81.194,70.956 U1.AF19@81.194,70.939 ; v1(80.725,86.425) 81.194,86.894 U1.K19@81.194,86.939 ; v1(81.675,89.45) 81.683,89.45 U1.H20@82.194,88.939 ; v1(82.7,66.4) 82.733,66.4 U1.AL21@83.194,65.939 ; v2(82.763,22.663) 82.825,22.725 R343.1@83.45,22.725 ; U1.AT21@83.194,60.939 v1@83.68,61.425 ; v1(83.675,88.425) 84.161,87.939 U1.J22@84.194,87.939 ; U1.AP22@84.194,62.939 v1@84.655,63.4 ; v3(118.5,21.5) R317.1@119.3,21.5 R318.1@120.6,21.5 R319.1@121.9,21.5 v3(123.8,21.5)
  16_Bottom w0.17: C445.2@68.2,80.515 68.665,80.515 69.175,81.025 R203.1@70.525,81.025 ; v3(72.5,106.5) R207.1@73.2,106.5 ; R196.1@85.9,70.175 86.2,69.875 86.2,68.8 86.561,68.439 v1(86.472,68.439)
  16_Bottom w0.2: C546.2@56.4,142.3 56.9,142.3 v2(57.1,142.1) ; R321.1@64.65,43.6 64.65,43.175 v1(64.95,42.875) 64.8,42.725 C388.2@64.8,41.2 ; C456.2@83.2,60.76 83.2,60.945 v1(83.755,61.5) ; C452.2@84.2,62.76 84.2,62.9 v1(84.7,63.4) ; C571.2@86,23.325 86.7,23.325 v2(86.8,23.225) ; C570.2@89.8,29.025 89.8,28.225 v2@89.9,28.125 ; v2@93.5,28.025 v2(93.5,28.125) C572.2@93.5,28.925 ; v2@93.9,25.225 94.1,25.025 C573.2@94.7,25.025 ; v2@94.4,20.425 C574.2@94.4,20.925
  16_Bottom w0.25: R334.1@51.1,128.95 51.15,129 L18.2@51.15,129.65 ; R333.1@65.3,125.65 65.3,124.75 L17.2@65.35,124.7
  16_Bottom w0.3: L14.1@31.575,28.45 v3(31.575,29.725) ; L18.2@51.15,129.65 51.15,130.35 v3(51.2,130.4) ; v3(65.3,123.9) L17.2@65.3,124.7 65.35,124.7 v3(66.1,124.7) ; C446.2@66.225,82.23 66.53,82.23 v1(66.725,82.425) ; C450.2@67.15,79.185 67.44,79.185 v1(67.694,79.439) ; v1(67.694,80.439) 67.77,80.515 C445.2@68.2,80.515 ; v1(78.7,62.4) 78.96,62.66 C447.2@78.96,62.9 ; R326.1@78.925,86.475 80.675,86.475 v1(80.725,86.425) 81.125,86.825 C449.2@81.125,87.165 ; R195.1@79.45,69.7 79.1,69.7 78.9,69.9 78.9,70.9 78.95,70.95 C454.2@79.69,70.95 79.69,71.415 v1(79.7,71.425) ; v1(79.7,64.45) 79.7,64.464 80.021,64.785 C455.2@80.2,64.785 ; v1(80.7,66.4) 80.96,66.66 C451.2@80.96,66.9 ; v1(81.675,89.45) 81.985,89.14 C453.2@82.175,89.14 ; v1(82.7,66.4) 83.2,65.9 C448.2@83.2,65.76 ; v1(83.675,88.425) 83.935,88.165 C457.2@84.225,88.165
  other v3: 131.96,112.44 132.9,112.46 131.01,112.47 132.86,113.63 131.93,113.65 131.03,113.68 131.01,114.72 131.92,114.74 132.87,114.73
IO_2V5: C264.2 C265.2 C318.2 C319.2 C320.2 C321.2 C322.2 C323.2 C324.2 C325.2 C326.2 C330.2 C344.2 C345.2 C346.2 C347.2 C348.2 C349.2 C350.2 C351.2 C352.2 C356.2 C366.2 C370.2 C543.2 D5.2 D6.2 D7.2 D8.2 D9.2 D10.2 D11.2 D12.2 D13.2 D14.2 J8.255 J8.257 J8.259 J9.9 J10.9 J20.255 J20.257 J20.259 L19.2 L21.2 L22.2 Q1.5 Q1.6 Q1.7 Q1.8 R227.1 R232.1 R259.2 R260.2 R261.2 R262.1 R263.2 R283.2 R284.2 R285.2 R286.1 R287.2 R311.1 R316.1 R340.1 R341.1 U14.B1 U14.R9 U15.B1 U15.R9 U17.A3 U17.A11 U17.A19 U17.A24 U17.A34 U17.A52 U17.B12 U17.B15 U17.B17 U17.B19 U17.B23 U17.B24 U17.B31 U17.B34 U17.B36 U17.B41 U18.4 U19.3 U19.6 U20.A3 U20.A11 U20.A19 U20.A24 U20.A34 U20.A52 U20.B12 U20.B15 U20.B17 U20.B19 U20.B23 U20.B24 U20.B31 U20.B34 U20.B36 U20.B41 U21.4 U22.3 U22.6 U24.4 U25.1 U25.2 U31.3 X1.4 Y5.1 Y5.4 | length 132.7
  1_Top w0.1: v2(39.4,29.8) 39.6,29.8 39.9,29.5 U17.A3@40,29.5 ; v2(40.4,22.4) 40.6,22.4 40.8,22.6 U17.B12@40.8,23.6 ; U17.B15@42.6,23.6 42.6,22.9 42.6,22.5 42.9,22.2 v2(42.9,22) ; U17.B41@43.2,30.6 v2(43.2,31.8) ; v2(44.9,22.1) 44.9,22.638 45,22.738 45,23.262 45,23.4 44.9,23.5 U17.B19@45,23.6 ; U17.B36@46.2,30.6 v2(46.2,31.8) ; U17.B23@47.4,23.6 47.4,23 47.4,22.7 v2(47.7,22.4) ; U17.B31@47.6,28.6 48.5,28.6 48.8,28.3 49.4,28.3 v2(49.5,28.4) ; U17.B34@47.6,30.4 48.5,30.4 v2(48.9,30.8) ; v2(62.85,29.8) 63.05,29.8 63.35,29.5 U20.A3@63.45,29.5 ; v2(63.85,22.4) 64.05,22.4 64.25,22.6 U20.B12@64.25,23.6 ; U20.B15@66.05,23.6 66.05,22.9 66.05,22.5 66.25,22.3 66.2,22.25 v2(66.2,22.1) ; U20.B41@66.65,30.6 v2(66.65,31.8) ; v2(68.45,22.4) U20.B19@68.45,23.6 ; U20.B36@69.65,30.6 v2(69.65,31.8) ; U20.B23@70.85,23.6 70.85,23 70.85,22.7 v2(71.15,22.4) ; U20.B31@71.05,28.6 71.95,28.6 72.25,28.3 72.85,28.3 v2(72.95,28.4) ; U20.B34@71.05,30.4 71.95,30.4 v2(72.35,30.8)
  1_Top w0.2: R260.2@37.75,23.225 37.75,23.45 37.825,23.375 R261.2@37.825,24.1 ; R260.2@37.875,23.1 37.875,22.525 R259.2@38,22.4 R259.2@38,22.3 ; v2@39.4,24.8 39.3,24.7 U17.A11@40,24.7 ; R263.2@40.1,21.6 40.1,22 v2@40.4,22.3 ; U17.A52@40.5,31.2 v2(40.5,31.7) ; U17.B17@43.8,23.6 43.75,23.55 43.75,23.25 U17.A19@43.5,23 43.5,22.8 43.9,22.4 43.95,22.45 v2(44.092,22.45) ; v2(46.5,22.4) U17.A24@46.5,23 ; U17.B23@47.4,23.7 47.6,23.9 U17.B24@47.6,24.4 ; U17.A34@48.2,27.7 48.464,27.7 48.614,27.85 v2@49.45,27.85 ; D5.2@53.4,29.4 D6.2@53.4,30.7 ; D6.2@53.4,30.8 D7.2@53.4,32 ; D9.2@53.4,34.6 D8.2@53.4,33.3 53.4,32.4 D7.2@53.5,32.3 ; R285.2@61.4,24.1 61.4,23.25 61.45,23.2 R283.2@61.45,22.4 R283.2@61.45,22.3 ; v2@62.85,24.8 62.75,24.7 U20.A11@63.45,24.7 ; R287.2@63.55,21.6 63.55,22 v2@63.85,22.3 ; U20.A52@63.95,31.2 v2(63.95,31.7) ; 67.17,22.58 67.35,22.4 v2(67.45,22.4) ; 67.17,22.581 66.95,22.801 U20.A19@66.95,23 67.2,23.25 67.2,23.55 U20.B17@67.25,23.6 ; v2(69.95,22.4) U20.A24@69.95,23 ; U20.B23@70.85,23.7 71.05,23.9 U20.B24@71.05,24.4 ; U20.A34@71.65,27.7 71.914,27.7 72.064,27.85 v2@72.9,27.85 ; D10.2@76.85,29.4 D11.2@76.85,30.7 ; D11.2@76.85,30.8 D12.2@76.85,32
  1_Top w0.25: C366.2@12.987,30.125 12.987,31.035 v2(12.997,31.025) ; v1(25.398,112.725) J20.255@26.6,112.725 ; v1(25.398,113.725) J20.259@26.6,113.725 ; J20.257@26.6,113.225 v1(27.75,113.225) ; v2(37.05,23.225) R260.2@37.75,23.225 R260.2@37.875,23.1 ; v2(37.2,24.1) 37.825,24.1 R261.2@37.925,24.1 ; v1(37.5,113.225) J8.257@38.6,113.225 ; J8.255@38.6,112.725 v1(39.75,112.725) ; J8.259@38.6,113.725 v1(39.75,113.725) ; U19.6@39.075,34 39.075,33.725 39.7,33.1 v2(40,33.1) ; v2@49.5,27.9 v2(49.5,28.4) ; v2@49.6,27.9 49.7,28 50.1,28 C325.2@50.2,28.1 ; C318.2@49.9,20.2 C318.2@49.95,20.2 ; U18.4@49.95,21.8 C318.2@49.95,20.2 ; v2(50,19.5) 49.99,19.49 C318.2@49.99,20.2 ; R262.1@51.05,20.2 C318.2@49.99,20.2 ; D5.2@53.4,29.4 v2(54.2,29.4) ; D6.2@53.4,30.7 v2(54.2,30.7) ; D7.2@53.4,32 54.3,32 v2(54.2,32) ; D8.2@53.4,33.3 v2(54.2,33.3) ; D9.2@53.4,34.6 54.3,34.6 v2(54.2,34.6) ; v2(60.425,23.2) R284.2@61.45,23.2 ; v2(60.65,24.1) R285.2@61.375,24.1 R285.2@61.4,24.1 ; U22.6@62.525,34 62.525,33.725 63.15,33.1 v2(63.45,33.1) ; v2@72.95,27.9 v2(72.95,28.4) ; v2@73.05,27.9 73.15,28 73.55,28 C351.2@73.65,28.1 ; C344.2@73.35,20.2 C344.2@73.4,20.2 ; U21.4@73.4,21.8 C344.2@73.4,20.2 ; v2(73.45,19.5) 73.44,19.49 C344.2@73.44,20.2 ; R286.1@74.5,20.2 C344.2@73.44,20.2 ; D10.2@76.85,29.4 v2(77.65,29.4) ; D11.2@76.85,30.7 v2(77.65,30.7) ; v2(77.65,32) 77.75,32 D12.2@76.85,32 D13.2@76.85,33.3 ; v2(77.65,33.3) D13.2@76.85,33.3 ; v2(77.65,34.6) D14.2@76.85,34.6 D13.2@76.85,33.3 ; v1(112.7,54.8) 112.8,54.8 U15.B1@112.8,55.4 ; v1(112.8,67.55) U14.B1@112.8,68.1 ; U15.R9@123.2,61.8 123.2,61.9 v1(123.5,62.2) ; U14.R9@123.2,74.5 v1(123.7,75) ; C318.2@49.95,20.2 C318.2@49.99,20.2 ; C344.2@73.4,20.2 C344.2@73.44,20.2
  1_Top w0.3: R316.1@8.687,35.275 8.687,36.115 v2(8.697,36.125) ; R311.1@11.887,28.475 12.747,28.475 U24.4@13.197,28.925 ; C366.2@12.987,30.125 12.987,29.135 U24.4@13.097,29.025 ; v3(47.2,147.4) 47.19,147.41 C543.2@47.19,148.5 47.19,149.09 47.325,149.225 Y5.4@48.45,149.225 ; v3@47.2,147.71 48.315,147.71 Y5.1@48.45,147.575 ; v2(50.7,144.4) R341.1@50.7,144.9 ; R340.1@50.9,142.9 v2(50.9,143.5) ; U31.3@55.095,148.226 v2(55.095,149.395) ; v2(83.1,17.5) 83.175,17.425 X1.4@84.15,17.425 84.15,18.25 v2(84.1,18.3)
  16_Bottom w0.2: v2(39.4,24.8) C323.2@40.1,24.8 ; C320.2@43.2,31.2 v2(43.2,31.8) ; v2@44,22.6 44.3,22.9 C324.2@44.5,22.9 44.6,22.9 45,22.5 45,22 v2(44.9,22.1) ; v2(46.5,22.4) 47.1,22.4 ; C326.2@47.1,22.8 47.1,22.4 ; v2(47.7,22.4) 47.1,22.4 ; v2(62.85,24.8) C348.2@63.55,24.8 ; C352.2@66.65,31.2 v2(66.65,31.8) ; v2@67.45,22.6 67.75,22.9 C349.2@67.95,22.9 68.05,22.9 v2@68.45,22.5 ; v2(69.95,22.4) 70.55,22.4 ; C350.2@70.55,22.8 70.55,22.4 ; v2(71.15,22.4) 70.55,22.4
  16_Bottom w0.25: v2@8.597,36.125 9.397,36.925 10.697,36.925 11.497,37.725 C370.2@11.672,37.725 ; v2(8.697,36.125) 8.697,33.325 10.897,31.125 12.897,31.125 v2(12.997,31.025) ; v2(40,33.1) 40.5,33.1 41,33.6 C330.2@41,34.4 ; C321.2@40.5,30.9 40.5,31.6 C319.2@41.1,31.6 ; C322.2@48.2,30.5 48.5,30.5 v2@48.9,30.9 ; v2(63.45,33.1) 63.95,33.1 64.45,33.6 C356.2@64.45,34.4 ; C346.2@63.95,30.9 63.95,31.6 C345.2@64.55,31.6 ; C347.2@71.65,30.5 71.95,30.5 v2@72.35,30.9
  16_Bottom w0.3: v3(15.4,89.9) R232.1@16.25,89.9 ; v3(28.3,89.8) 28.375,89.725 R227.1@28.375,89.1 ; L21.2@51.9,143.4 v2(51.9,144.1) ; L19.2@64.445,137.875 65.075,137.875 v2(65.1,137.9) ; v3(84.4,112.3) 84.589,112.3 85.189,111.7 L22.2@85.089,111.6 ; v1(112.7,54.8) 112.725,54.775 C265.2@112.725,54.31 ; v1(112.8,67.55) 112.8,67.06 C264.2@112.85,67.01
  other v2: 49.5,27.8 72.95,27.8 40.8,35.7 41.4,35.7 64.25,35.7 64.85,35.7 40.8,36.3 41.4,36.3 64.25,36.3 64.85,36.3 11.097,39.125 11.697,39.125 12.397,39.125 129.95,99.325 128.875,99.35 128.85,100.082 129.95,100.082
  other v3: 131.4,98.9 132.2,98.9 133,98.9 131.4,99.8 132.2,99.8 133,99.8
IO_3V3: C297.1 C376.2 C377.2 C541.2 C542.2 C551.2 C552.2 C555.2 C557.2 C566.2 C567.2 C568.2 L12.1 L23.1 L24.1 L25.1 L26.1 Q9.5 Q9.6 Q9.7 Q9.8 R242.2 R297.1 R298.1 U16.5 U29.1 U29.10 U33.20 U33.24 U33.28 | length 62.2
  1_Top w0.17: v3(98.3,136.7) 98.8,136.2 U29.10@98.8,136.055
  1_Top w0.2: v2(86.2,20.125) 86.6,20.125 86.7,20.225 U33.20@86.7,20.425 ; U33.24@88.3,20.425 v2(88.3,21.425) ; U33.28@89.9,20.425 v2(89.9,21.425)
  1_Top w0.3: v3(98.1,133.2) 98.125,133.175 U29.1@98.8,133.175
  16_Bottom w0.17: C541.2@98.3,136 v3(98.3,136.7)
  16_Bottom w0.2: C566.2@86.1,20.725 86.1,20.425 v2@86.3,20.225 ; C568.2@88.1,20.625 88.1,21.425 v2@88.2,21.525 ; v2@89.9,21.325 90,21.225 C567.2@90,20.625
  16_Bottom w0.3: R298.1@15.787,4.225 24.275,4.225 ; R297.1@26.387,1.825 25.275,1.825 24.8,2.3 24.8,3.7 24.275,4.225 ; C377.2@28.475,22.247 C377.2@28.497,22.225 ; v3(32.1,6.1) 24.9,6.1 24.3,5.5 24.3,4.251 24.275,4.225 ; v3(98.1,133.2) 98.5,132.8 C542.2@99.075,132.8 ; R242.2@110.25,9.2 109.15,9.2 109.05,9.1 109.05,3.4 v1(109.6,3.4) C297.1@111.85,3.4 ; U16.5@111.85,4.5 C297.1@111.85,3.4 ; C297.1@112.125,3.4 C297.1@111.85,3.4 ; L23.1@137.1,38.855 137.1,37.475 C552.2@137.275,37.3 ; C551.2@140.3,37.8 L24.1@140.3,38.855 ; C557.2@157.2,37.2 L25.1@157.2,38.855 ; L26.1@159.7,38.855 159.9,38.655 C555.2@159.9,37.8
  16_Bottom w0.5: v3(29.4,22) 29.35,21.95 C377.2@28.525,21.95 28.525,23.9 L12.1@28.475,23.95 C376.2@29.725,23.95 30.55,23.95 v3(30.599,23.9) ; v3(137.1,39.9) L23.1@137.1,38.855 L24.1@140.3,38.855 v3(140.3,39.9) ; v3(156.5,39.8) L25.1@156.5,38.855 157.2,38.855 L26.1@159.7,38.855 v3(159.7,39.8)
  other v1: 110.1,3.4 110.6,3.4 111.1,3.4
  other v2: 126.675,146.725 127.775,146.75 126.64,147.532 127.74,147.532
IO_5V: C112.2 C113.2 C327.2 C353.2 C384.2 R173.2 U12.17 U12.18 U12.19 U12.20 U12.21 U12.22 U12.23 U12.24 U19.1 U22.1 U25.5 | length 5.9
  1_Top w0.25: v3(8,37.1) 8.671,37.1 C384.2@8.697,37.125 9.762,37.125 U25.5@9.887,37.25 ; U19.1@40.925,34 C327.2@41.9,34 v2(41.9,33.5) ; U22.1@64.375,34 C353.2@65.35,34 v2(65.35,33.4)
  1_Top w0.5: v3(168.034,70.06) R173.2@168.034,70.95
  other v3: 172.62,84.22 171.8,84.25 172.61,85.16 171.78,85.18 171.83,86.49 172.61,86.5 171.8,87.42 172.59,87.4
IO_EN: Q2.1 Q11.1 R7.2 R59.2 | length 269.8
  1_Top w0.3: Q11.1@127.415,153.3 v3(128.6,153.3) ; Q2.1@128.545,104.94 129.35,104.94 v3(129.59,104.7) 129.66,104.63 R7.2@130.41,104.63
  5_int4_(sign) w0.15: v3(5.6,68.1) 1.1,68.1 0.9,68.3 0.9,145.4 1.6,146.1 13.2,146.1 15.6,148.5 17.3,148.5 22.8,154 99.7,154 100.17,154.47 128.13,154.47 128.6,154 v3(128.6,153.3) 129.8,152.1 129.8,141.55 128.1,139.85 128.1,129.84 129.32,128.62 129.32,123.12 130.72,121.72 130.72,117.18 130,116.46 130,105.62 129.59,105.21 v3(129.59,104.7)
  16_Bottom w0.5: v3(5.6,68.1) 5.695,68.005 5.795,68.005 6.295,67.505 R59.2@6.295,67.45
JTAG_TCK: J12.1 R328.2 U1.AW15 | length 91.9
  1_Top w0.17: v1(76.7,56.5) 77.194,56.994 U1.AW15@77.194,57.939
  1_Top w0.3: J12.1@104.08,25.15 104.08,22.645 104.06,22.625 104.1,22.585 v3(104.1,21.8) 104.175,21.725 R328.2@104.925,21.725
  5_int4_(sign) w0.15: v1(76.7,56.5) 76.7,52.2 78.4,50.5 78.4,21.2 79.3,20.3 79.3,9.8 82.6,6.5 98.5,6.5 101.7,9.7 101.7,15.8 104.2,18.3 104.2,21.7 v3(104.1,21.8)
JTAG_TDI: J12.9 R330.2 U1.AL15 | length 110.7
  1_Top w0.17: v3(114.2,21.8) 114.2,22.565 R330.2@114.26,22.625
  1_Top w0.3: U1.AL15@77.194,65.939 v1(77.633,65.5) ; J12.9@114.24,25.15 114.24,22.645 R330.2@114.26,22.625
  5_int4_(sign) w0.15: v1(77.633,65.5) 77.6,65.5 77.2,65.1 77.2,58.9 77.575,58.525 77.575,55.238 78.8,54.013 78.8,22.3 79.9,21.2 79.9,10.1 82.9,7.1 98.4,7.1 101.2,9.9 101.2,17.9 103.1,19.8 103.1,22.8 104,23.7 112.9,23.7 114.2,22.4 v3(114.2,21.8)
JTAG_TDO: J12.3 U1.AW14 | length 93.8
  1_Top w0.17: v1(76.1,57) 76.194,57.094 U1.AW14@76.194,57.939 ; v3(106.6,22.8) 106.62,22.82 J12.3@106.62,25.15
  5_int4_(sign) w0.15: v1(76.1,57) 76.1,52.15 76.8,51.45 76.8,22.1 78.6,20.3 78.6,9.7 82.4,5.9 99.2,5.9 102.5,9.2 102.5,15.8 106.6,19.9 v3(106.6,22.8)
JTAG_TMS: J12.5 R331.2 U1.AV13 | length 97.9
  1_Top w0.17: U1.AV13@75.194,58.939 75.7,58.433 75.7,57.325 75.475,57.1 75.475,56.525 v1(75.5,56.5)
  1_Top w0.3: v3(109.13,21.73) 109.16,21.76 R331.2@109.16,22.625 J12.5@109.16,25.15
  5_int4_(sign) w0.15: v1(75.5,56.5) 75.5,51.867 76.3,51.067 76.3,21.8 78.1,20 78.1,9.5 82.3,5.3 99.7,5.3 103.2,8.8 103.2,15.8 v3(109.13,21.73)
JTAG_TRST: J12.7 U1.AR13 | length 104
  1_Top w0.17: U1.AR13@75.194,61.939 75.194,61.806 75.6,61.4 v1(75.65,61.4) ; v3(111.7,22.7) J12.7@111.7,25.15
  5_int4_(sign) w0.15: v1(75.65,61.4) 75.194,60.944 75.194,57.294 74.997,57.097 75,57.094 75,50.075 75.7,49.375 75.7,21.7 77.5,19.9 77.5,9.1 81.9,4.7 100,4.7 103.8,8.5 103.8,13.3 111.7,21.2 v3(111.7,22.7)
MAIN_12V: C66.2 C74.1 C75.1 C76.1 C77.1 C78.2 C99.2 C100.2 D1.1 F1.2 J5.1 Q13.1 Q13.2 Q13.3 Q20.5 Q20.6 Q20.7 Q20.8 Q21.1 Q21.2 Q21.3 R4.2 R5.2 R8.2 R10.2 R112.2 R115.2 R124.1 R125.2 R132.2 R133.2 R134.2 R135.2 R155.2 U23.A11 U23.A12 U23.B11 U23.B12 U23.C11 U23.C12 U23.D11 U23.D12 U23.E12 U23.H12 U23.J11 U23.J12 U23.K11 U23.K12 U23.L11 U23.L12 U23.M11 U23.M12 | length 15
  1_Top w0.25: R8.2@133.3,109.5 134.71,109.5 135.01,109.2 R10.2@135.01,108.5 ; R10.2@135.11,108.4 R10.2@135.01,108.5 ; v3@135.61,107.6 R4.2@134.91,107.6 135.01,107.7 R10.2@135.01,108.5 ; R5.2@135.71,106.9 135.71,107.5 135.81,107.6 v3(135.71,107.6) ; v3(138.86,151.92) 139.02,152.08 R155.2@139.02,153.12 ; R115.2@145.395,107.45 145.76,107.085 v3(145.76,106.73)
  1_Top w0.3: U23.B11@135.685,150.015 U23.B11@135.685,150.14 ; U23.B12@135.685,151.285 U23.B12@135.685,151.34 ; v3@136.3,152.13 v3@136.315,152.13 ; U23.C11@136.955,150.015 U23.C11@136.955,150.07
  16_Bottom w0.25: v3(140.545,102.75) R125.2@141.245,102.75 ; R124.1@145.345,106 145.345,106.415 145.545,106.615 v3@145.68,106.615
  16_Bottom w0.3: R112.2@152.56,102.93 152.52,102.89 C66.2@152.52,101.96 152.52,100.97 v3(152.73,100.76) ; 163.59,119.2 R135.2@164.3,119.2 ; 163.67,117.7 C78.2@164.3,117.7 ; R134.2@165,123.4 165,124.21 ; R132.2@166.9,123.4 166.9,124.18 ; R133.2@167.9,123.4 167.9,124.12
  other v2: 163.565,135.54 164.665,135.54 165.765,135.54 163.565,136.64 164.665,136.64 165.765,136.64 163.565,137.74 164.665,137.74 165.765,137.74
  other v3: 161.75,92.65 162.79,92.67 162.8,93.6 161.76,93.63 161.74,94.62 162.79,94.63 161.77,95.65 162.8,95.63 150.55,99.74 151.61,99.73 153.85,99.74 152.73,99.77 150.54,100.74 151.63,100.74 153.85,100.75 164.09,134.97 165.27,134.97 165.27,136.07 164.07,136.1 164.13,137.19 165.18,137.2 143.92,150.61 152.4,150.63 145.21,150.65 146.48,150.65 147.75,150.65 149.02,150.66 150.2,150.66 151.3,150.67 131.65,150.71 130.6,150.725 132.76,150.73 133.78,150.725 135.1,150.725 136.4,150.725 137.59,150.725 138.86,150.725 130.62,151.93 132.74,151.93 133.78,151.93 135.1,151.93 136.3,151.93 137.61,151.93 143.94,151.93 145.21,151.93 146.48,151.93 147.75,151.93 149.02,151.93 150.23,151.93 151.35,151.93 131.68,151.94 152.42,151.95 144.57,152.85 145.85,152.85 147.08,152.85 148.34,152.85 149.67,152.85 132.02,152.89 133.14,152.89 134.4,152.89 135.67,152.89 136.94,152.89
MINI_PCIE_PER_N: J13.23 U1.D9 | length 106.5
  1_Top w0.1: v3@5.8,135.56 v3(5.8,135.85) ; U1.D9@71.161,92.939 U1.D9@71.194,92.939
  1_Top w0.15: v3@5.8,135.56 5.875,135.485 6.66,135.485 6.925,135.75 J13.23@8,135.75 ; v1(70.7,93.4) 70.733,93.4 U1.D9@71.194,92.939
  10_int9_(sign) w0.11: v3(5.8,135.85) 5.36,135.41 3.813,135.41 3,134.597 3,123.69 8.89,117.8 59.9,117.8 68.09,109.61 68.09,94.812 69.107,93.795 70.305,93.795 v1(70.7,93.4)
MINI_PCIE_PER_P: J13.25 U1.C9 | length 105.8
  1_Top w0.1: v3(5.8,134.85) v3@5.8,135.14 ; v1(70.7,94.4) v1@70.733,94.4
  1_Top w0.15: v3@5.8,135.14 5.875,135.215 6.66,135.215 6.925,134.95 J13.25@8,134.95 ; v1(70.7,94.4) 71.086,94.014 71.119,94.014 U1.C9@71.194,93.939
  10_int9_(sign) w0.11: v3(5.8,134.85) 5.45,135.2 3.9,135.2 3.21,134.51 3.21,123.777 8.977,118.01 59.987,118.01 68.3,109.697 68.3,94.899 69.194,94.005 70.305,94.005 v1(70.7,94.4)
MINI_PCIE_SMB_CLK: J13.30 U1.C14 | length 84.9
  1_Top w0.17: J13.30@16.2,132.95 v3(17.95,132.95) ; U1.C14@76.194,93.939 76.705,94.45 v1(76.75,94.45)
  10_int9_(sign) w0.1: v3(17.95,132.95) 30.875,132.95 42.475,121.35 62.3,121.35 76.8,106.85 76.8,99.966 76.8,99.634 76.8,99.192 77.194,98.798 77.194,94.894 v1(76.75,94.45)
MINI_PCIE_SMB_DATA: J13.32 U1.D14 | length 94
  1_Top w0.17: v3(14.6,132.175) 14.625,132.15 J13.32@16.2,132.15 ; v1(75.725,92.375) 76.194,92.844 U1.D14@76.194,92.939
  10_int9_(sign) w0.1: v3(14.6,132.175) 14.925,132.175 16.525,133.775 30.913,133.775 42.688,122 62.975,122 78.425,106.55 78.425,96.925 78.175,96.675 78.175,93.9 77.2,92.925 76.275,92.925 v1(75.725,92.375)
MINI_PCIE_USB_D_N: J13.36 U1.D13 | length 84.1
  1_Top w0.15: J13.36@16.2,130.55 17.775,130.55 v3(17.8,130.575) ; U1.D13@75.194,92.939 75.65,93.395 v1(75.65,93.425)
  10_int9_(sign) w0.11: v3(17.8,130.575) 18.12,130.255 19.542,130.255 29.072,120.725 61.647,120.725 76.185,106.187 76.185,98.937 76.335,98.787 76.335,98.72 76.335,94.188 75.987,93.84 75.675,93.84 75.65,93.815 v1(75.65,93.425)
MINI_PCIE_USB_D_P: J13.38 U1.C13 | length 83.3
  1_Top w0.15: J13.38@16.2,129.75 17.8,129.75 v3(17.825,129.725) ; U1.C13@75.194,93.939 75.65,94.395 v1(75.65,94.4)
  10_int9_(sign) w0.11: v3(17.825,129.725) 18.145,130.045 19.455,130.045 28.985,120.515 61.56,120.515 75.975,106.1 75.975,98.85 76.125,98.7 76.125,98.633 76.125,94.275 75.9,94.05 75.675,94.05 75.65,94.075 v1(75.65,94.4)
MINIPCIE_CLKREQ_L: J13.7 U1.B11 | length 95.6
  1_Top w0.17: J13.7@8,145.35 10.4,145.35 11.82,143.93 11.82,141.668 13.268,140.22 21.518,140.22 29.538,132.2 37,132.2 39.265,129.935 39.265,122.473 41.218,120.52 53.78,120.52 73.014,101.286 73.014,98.525 72.7,98.211 72.7,95.433 U1.B11@73.194,94.939
MINIPCIE_LED_WLAN_L: J13.44 U1.B10 | length 73.1
  1_Top w0.17: J13.44@16.2,127.35 16.25,127.3 18.55,127.3 23.29,122.56 29.763,122.56 32.483,119.84 53.26,119.84 71.9,101.2 71.9,97.067 71.733,96.9 71.733,95.4 U1.B10@72.194,94.939